# Altium PCB 100_AC-DC.PcbDoc
Units mil, origin at the board's own origin, x right, y up, seen from the top; angles counter-clockwise.
Board outline 6141.73 x 10078.74 mil, 2 copper layers (Top Layer, Bottom Layer), stack 58.66 mil thick; 69 components, 31 nets, 183 pads, 0 vias.
Unrouted connection lines stored in the file: 137.
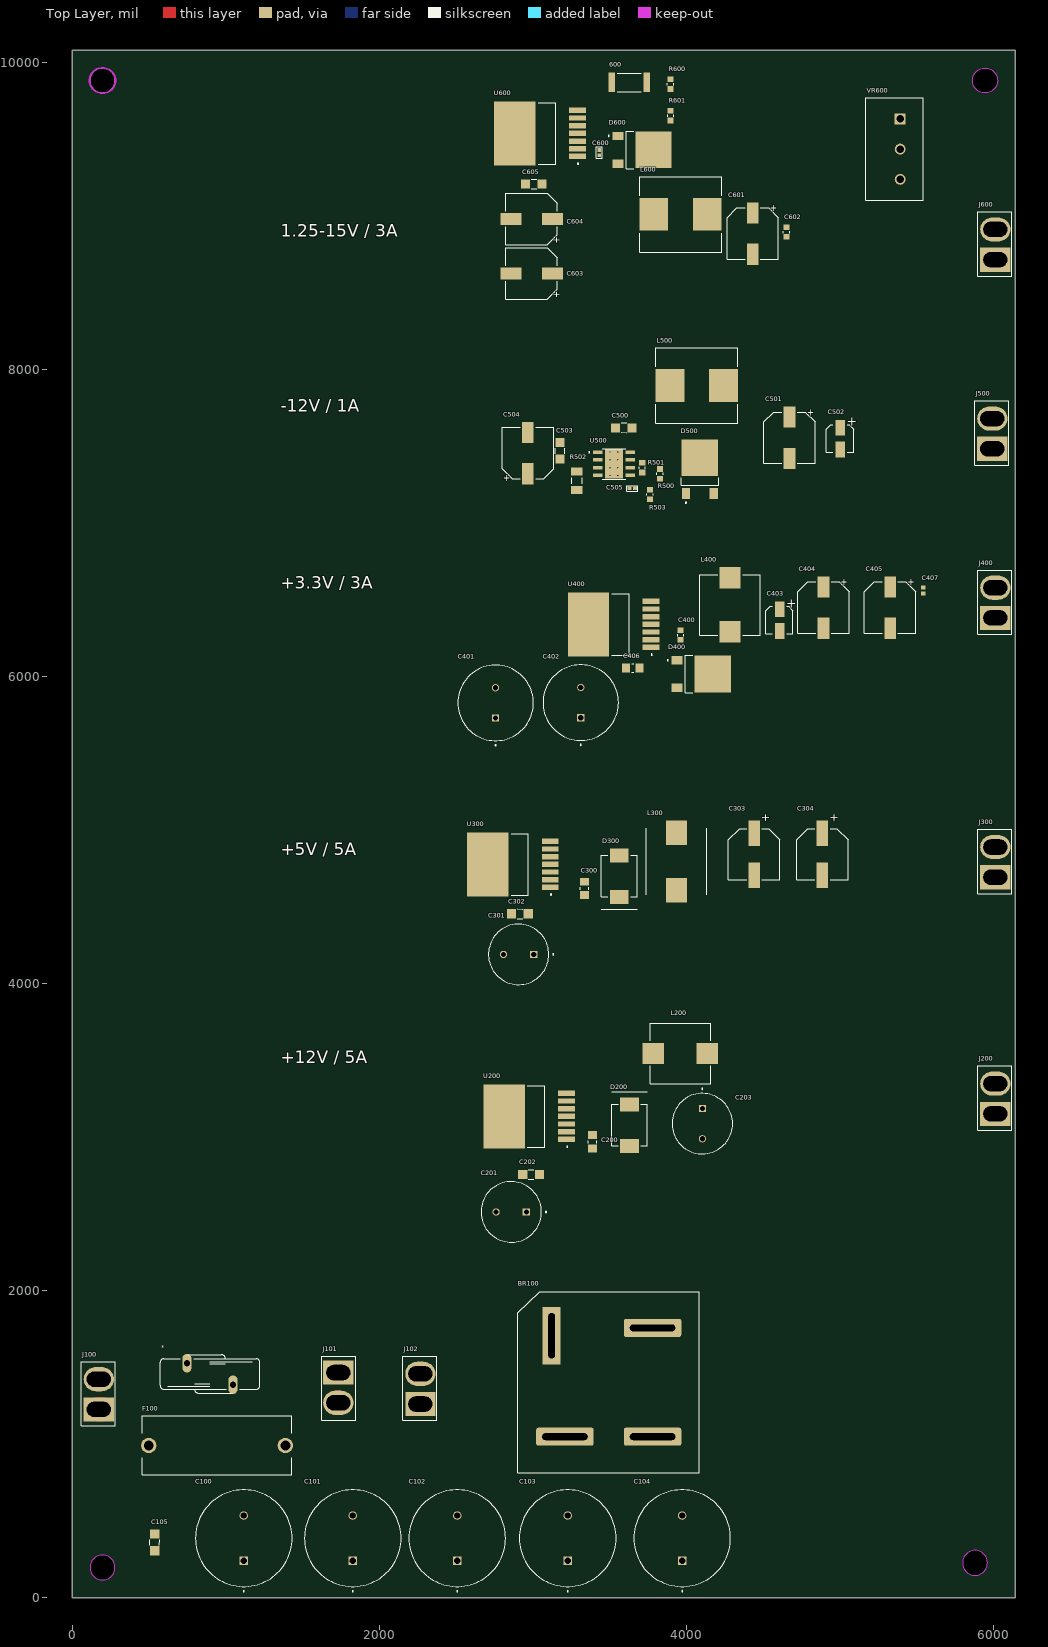
[diagram p0: Top Layer view]
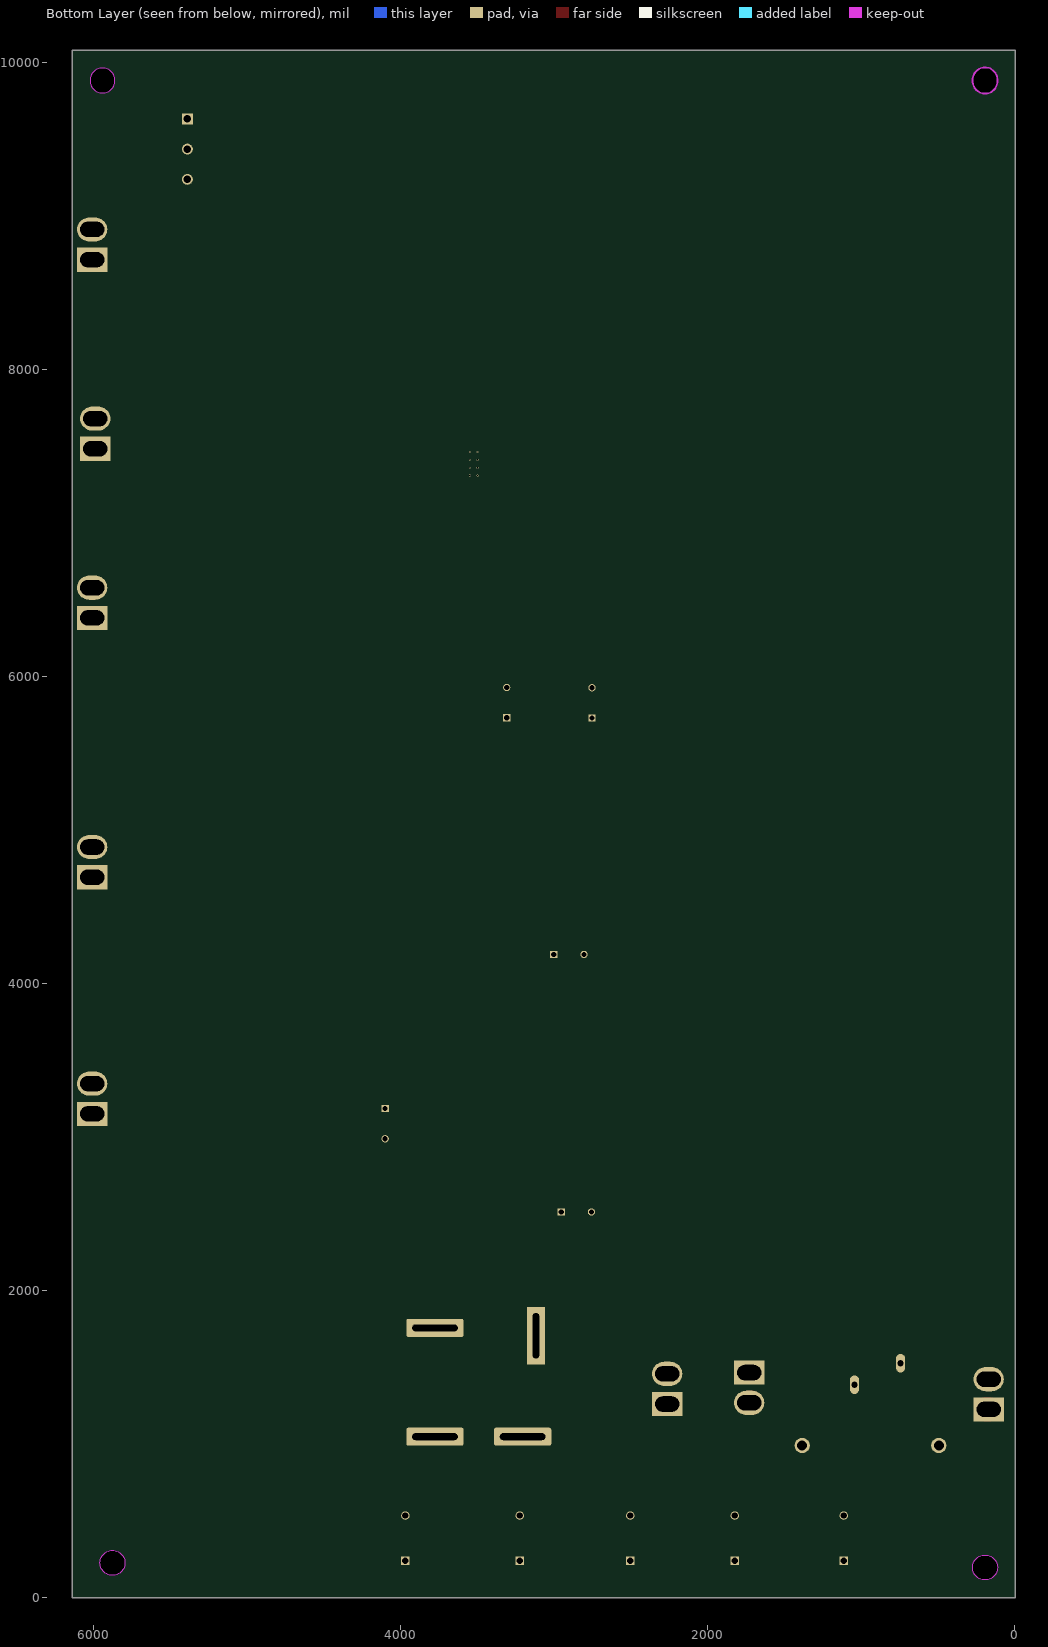
[diagram p1: Bottom Layer view, seen from below]

## Layer stack, top to bottom
Top Solder: solder mask 0.4, Solder Resist, Dk 3.5
Top Layer: signal copper 1.18
Dielectric 1: dielectric 56.3, FR-4, Dk 4.8
Bottom Layer: signal copper 1.18
Bottom Solder: solder mask 0.4, Solder Resist, Dk 3.5

## Board outline
-2.13,0 -2.13,10078.74 6139.6,10078.74 6139.6,0
cut-out: 5796.38,226.85 ccw(c5877.75,226.85) 5877.75,145.47 ccw(c5877.75,226.85) 5959.13,226.85 ccw(c5877.75,226.85) 5877.75,308.23 ccw(c5877.75,226.85)
cut-out: 113.35,196.85 ccw(c194.72,196.85) 194.72,115.47 ccw(c194.72,196.85) 276.1,196.85 ccw(c194.72,196.85) 194.72,278.23 ccw(c194.72,196.85)
cut-out: 5942.75,9800.51 cw(c5942.75,9881.89) 5861.38,9881.89 cw(c5942.75,9881.89) 5942.75,9963.27 cw(c5942.75,9881.89) 6024.13,9881.89 cw(c5942.75,9881.89)
cut-out: 194.72,9800.25 cw(c194.72,9881.89) 113.08,9881.89 cw(c194.72,9881.89) 194.72,9963.53 cw(c194.72,9881.89) 276.21,9886.9 cw(c276.1,9881.89) 281.12,9881.89 cw(c194.72,9881.89) 281.06,9884.86 281.07,9884.69 cw(c276.05,9884.69) 276.34,9879.68 cw(c194.72,9881.89)
cut-out: 194.72,9800.78 cw(c194.72,9881.89) 113.61,9881.89 cw(c194.72,9881.89) 194.72,9963 cw(c194.72,9881.89) 275.68,9886.89 cw(c194.72,9881.89) 275.84,9881.89 275.81,9879.68 cw(c194.72,9881.89)
cut-out: 113.35,9881.89 cw(c194.72,9881.89) 194.72,9963.27 cw(c194.72,9881.89) 276.1,9881.89 cw(c194.72,9881.89) 194.72,9800.51 cw(c194.72,9881.89)

## Design rules (kind name [scope] priority, off if disabled: settings)
Clearance [All] p1: gap=6 ignorepadtopadclearanceinfootprint=FALSE
Clearance Clearance_Kepaut [OnLayer('Keep-Out Layer')] p2: gap=8 ignorepadtopadclearanceinfootprint=FALSE
HoleSize [All] p1: absolutevalues=TRUE maxlimit=6.3 minlimit=6.3 maxpercent=80.000 minpercent=20.000
HoleToHoleClearance [All] p1: gap=4 allowstackedmicrovias=TRUE
MinimumSolderMaskSliver [All] p1: minsoldermaskwidth=6
PolygonConnect [All] p1: connectstyle=Relief reliefconductorwidth=10 reliefentries=4 polygonreliefangle="90 Angle" airgapwidth=10
RoutingVias [All] p1: holewidth=28 width=50 viastyle="Through Hole" minholewidth=28 minwidth=50 maxholewidth=28 maxwidth=50
SilkToSilkClearance [All] p1: silktosilkclearance=6
SilkToSolderMaskClearance [IsPad] p1: minsilkscreentomaskgap=4 clearancetoexposedcopper=TRUE
SolderMaskExpansion [All] p1: expansion=4 istentingtop=FALSE
SupplyNets "Schematic Supply Nets_6" [InNet('+1.25-15V')] p1: voltage=0.000
SupplyNets "Schematic Supply Nets_5" [InNet('+24V')] p2: voltage=0.000
SupplyNets "Schematic Supply Nets_4" [InNet('+12V')] p3: voltage=0.000
SupplyNets "Schematic Supply Nets_3" [InNet('+5V')] p4: voltage=0.000
SupplyNets "Schematic Supply Nets_2" [InNet('GND')] p5: voltage=0.000
SupplyNets "Schematic Supply Nets_1" [InNet('-12V')] p6: voltage=0.000
SupplyNets "Schematic Supply Nets" [InNet('+3.3V')] p7: voltage=0.000
Width [All] p1: maxlimit=500 minlimit=6 preferedwidth=10
25 further rules are at their usual default settings.

## Classes and differential pairs
component class 204_DC-DC: 600 C600 C601 C602 C603 C604 C605 D600 J600 L600 R600 R601 U600 VR600
component class 203_DC-DC: C500 C501 C502 C503 C504 C505 D500 J500 L500 R500 R501 R502 R503 U500
component class 202_DC-DC: C400 C401 C402 C403 C404 C405 C406 C407 D400 J400 L400 U400
component class 201_DC-DC: C300 C301 C302 C303 C304 D300 J300 L300 U300
component class 200_DC-DC: C200 C201 C202 C203 D200 J200 L200 U200
component class 100_AC-DC: * BR100 C100 C101 C102 C103 C104 C105 F100 J100 J101 J102

## Components (designator, comment, footprint, x,y, rotation, side; value= is the part's Value field where it differs from the comment)
600 "33R 2W" 2512 3625,9870 r0 top value=33R
* "RV_Varistor_300VAC_125J_D14" RV_Varistor_300VAC_125J_D14 900.74,1446.34 r270 top
BR100 "1000V 25A" D_Bridge_1000V_25A_KBPC_FP 3490,1415 r0 top
C100 "C_Alum_2200uF_50V_D18" C_Alum_2200uF_50V_D18 1105,392.64 r90 top value=2200uF
C101 "C_Alum_2200uF_50V_D18" C_Alum_2200uF_50V_D18 1815,392.64 r90 top value=2200uF
C102 "C_Alum_2200uF_50V_D18" C_Alum_2200uF_50V_D18 2495,392.64 r90 top value=2200uF
C103 "C_Alum_2200uF_50V_D18" C_Alum_2200uF_50V_D18 3215,392.64 r90 top value=2200uF
C104 "C_Alum_2200uF_50V_D18" C_Alum_2200uF_50V_D18 3960,392.64 r90 top value=2200uF
C105 "100nF 100V" 1206#1 535,360 r90 top value=100nF
C200 "10000pF 50V" 0805 3386.81,2969.32 r270 top value=10nF
C201 "470uF 20%" Cap_470uF_35V_ALUM_RAD 2861.81,2507.63 r180 top value=470uF
C202 "100nF 100V" 1206#1 2985.95,2757.63 r180 top value=100nF
C203 "470uF 20%" Cap_470uF_35V_ALUM_RAD 4106.81,3092.63 r270 top value=470uF
C300 "10000pF 50V" 0805 3335,4620 r270 top value=10nF
C301 "470uF 20%" Cap_470uF_35V_ALUM_RAD 2910,4185 r180 top value=470uF
C302 "100nF 100V" 1206#1 2913.43,4455 r180 top value=100nF
C303 "180uF" Cap_180uF_16V_ALU_SMD 4439.02,4847.54 r90 top
C304 "180uF" Cap_180uF_16V_ALU_SMD 4884.02,4847.54 r90 top
C400 "10nF 100V" 0603 3960,6270 r270 top value=10nF
C401 "680uF 50V" Cap_680uF_50V_ALUM_RAD 2725,5833.43 r90 top value=680uF
C402 "680uF 50V" Cap_680uF_50V_ALUM_RAD 3280,5835 r90 top value=680uF
C403 "10uF 10V" RADIAL-CAN-SMD_Diax4mm_Hx5.5mm 4605,6367.41 r270 top value=10uF
C404 "220uF 50V" RADIAL-CAN-SMD_Diax8mm_Hx10.2mm 4890,6449.1 r270 top value=220uF
C405 "220uF 50V" RADIAL-CAN-SMD_Diax8mm_Hx10.2mm 5325,6449.1 r270 top value=220uF
C406 "0.47uF 50V" 0805 3648.31,6055 r180 top value=0.47uF
C407 "100nF 25V" 0402_RF 5540,6560 r270 top value=0.1uF
C500 "100nF 100V" 1206#1 3590,7620 r0 top value=100nF
C501 "220uF 35V" RADIAL-CAN-SMD_Diax8mm_Hx10.2mm 4670,7555 r270 top value=220uF
C502 "10uF 25V" RADIAL-CAN-SMD_Diax4mm_Hx5.5mm 5000,7550 r270 top value=10uF
C503 "10uF 50V" 1206#1 3175,7470 r90 top value=10uF
C504 "100uF 25V" RADIAL-CAN-SMD_Diax8mm_Hx10.2mm 2965,7455 r90 top value=100uF
C505 "22nF 25V" 0402_1.0mm 3645,7225 r180 top value=22nF
C600 "10nF 50V" 0402 3430,9412.28 r270 top value=10nF
C601 "100uF 25V" RADIAL-CAN-SMD_Diax8mm_Hx10.2mm 4430,8885 r270 top value=100uF
C602 "100nF 25V" 0603 4650,8895 r270 top value=0.1uF
C603 "220uF 50V" RADIAL-CAN-SMD_Diax8mm_Hx10.2mm 2990,8625 r180 top value=220uF
C604 "220uF 50V" RADIAL-CAN-SMD_Diax8mm_Hx10.2mm 2990,8980 r180 top value=220uF
C605 "100nF 100V" 1206#1 3004.49,9207.39 r180 top value=100nF
D200 "100V 8A" DO_214AB 3626.81,3077.63 r270 top
D300 "100V 8A" DO_214AB 3560,4700 r90 top
D400 "60V 10A" D_Schottky_30V_200mA_SOT23-3_1 4070,6010 r0 top
D500 "60V 10A" D_Schottky_30V_200mA_SOT23-3_1 4090.59,7325.49 r90 top
D600 "60V 10A" D_Schottky_30V_200mA_SOT23-3_1 3685,9425 r0 top
F100 "500V 10A" FUSE_HLD_CARTRIDGE_5x20mm 940.74,991.34 r0 top
J100 "2X1" CON_2X1_TH_5MM_BAT 170.74,1324.76 r90 top
J101 "2X1" CON_2X1_TH_5MM_BAT 1730.74,1368.15 r270 top
J102 "2X1" CON_2X1_TH_5MM_BAT 2265,1360 r90 top
J200 "2X1" CON_2X1_TH_5MM_BAT 6010,3250 r90 top
J300 "2X1" CON_2X1_TH_5MM_BAT 6010,4790.95 r90 top
J400 "2X1" CON_2X1_TH_5MM_BAT 6010,6480 r90 top
J500 "2X1" CON_2X1_TH_5MM_BAT 5990,7581.57 r90 top
J600 "2X1" CON_2X1_TH_5MM_BAT 6010,8813.43 r90 top
L200 "15uH" L_15uH_7A_SMD 3961.81,3537.63 r0 top
L300 "22uH 5A" L_22uH_5A_SMD_FIXED 3945,4800 r90 top value=22uH
L400 "15uH" L_15uH_7A_SMD 4290,6470 r90 top
L500 "47uH 3A" L_2SMD_11.5x10X4MM 4065,7895 r180 top value=47uH
L600 "47uH 3A" L_2SMD_11.5x10X4MM 3960,9010 r180 top value=47uH
R500 "10k 1/10W" 0603 3825,7320 r90 top value=10k
R501 "140K 1/10W" 0603 3710,7360 r90 top value=140k
R502 "200k 1/4W" 1206#2 3285,7275 r270 top value=200k
R503 "10k 1/10W" 0603 3760,7185 r90 top value=10k
R600 "1/10W" 0603 3895,9858.37 r270 top value=26K1
R601 "1k 1/10W" 0603 3895,9653.37 r90 top value="1k 0.1%"
U200 "DCDC_12V_5A_TO263" DCDC_12V_5A_TO263 2961.81,3137.63 r90 top
U300 "DCDC_5V_5A_TO263" DCDC_5V_5A_TO263 2792.32,4760 r90 top
U400 "DCDC_3.3V_5A_TO263" DCDC_3.3V_5A_TO263 3602.36,6337.95 r90 top
U500 "DCDC_ADJ_5A_DDA" DCDC_ADJ_5A_DDA 3520.28,7394.8 r0 top
U600 "DCDC_ADJ_5A_TO263" DCDC_ADJ_5A_TO263 3078.39,9536.33 r90 top
VR600 "10k 1/5W" Pot_3x1_5mm_TH 5390,9435 r0 top value=10K

## Footprints (in the part's own frame and the unit in brackets; to place one, negate y for a bottom-side part, rotate by r counter-clockwise, add the part's x,y. Pads: shape width x height; smd on the part's side, far side on the other; paste and mask are expansions set on the pad)
0402 [mm] "1005 Metric / 20190225 / C-A.Serna.A"
  rect 0.62x0.584 smd: 1(-0.45,0) 2(0.45,0)
  silkscreen extent -0.94,-0.48 0.94,0.47, body extent -0.5,-0.25 0.5,0.25, height 0.55
0402_1.0mm [mm] "1005 Metric/20230206/J-A.Sepulveda"
  rect 0.6x0.6 smd: 1(-0.45,0) 2(0.45,0)
  silkscreen extent -0.92,-0.47 0.92,0.47, body extent -0.5,-0.25 0.5,0.25, height 1.1
0402_RF [mil] "1005 Metric/20230306/ J-A.Sepulveda"
  rect 27x27 smd: 1(-19.5,0) 2(19.5,0)
  body extent -20,-10 19,10, height 22
0603 [mil] "1608 Metric / 20190225 / C-A.Serna.A"
  rect 37x40 smd: 1(-31.5,0) 2(31.5,0)
  silkscreen extent -7,-20 8,20, body extent -31,-16 32,16, height 12
0805 [mm] "2012 Metric / 20190225 / C-A.Serna.A"
  rect 1.3x1.5 smd: 1(-1.1,0) 2(1.1,0)
  silkscreen extent -0.2,-0.7 0.2,0.7, body extent -1.1,-0.7 1.1,0.7, height 1
1206#1 [mm] "/20220628/F-A.Ospina"
  rect 1.5x1.5 smd: 1(-1.375,0) 2(1.375,0)
  silkscreen extent -0.45,-0.79 0.45,0.79, body extent -1.62,-0.78 1.58,0.82, height 2.01
1206#2 [mm] "3216 metric/ 20190327/ V-A.Patino"
  rect 1.35x1.9 smd: 1(-1.55,0) 2(1.55,0)
  silkscreen extent -0.5,-0.85 0.5,0.85, body extent -1.67,-0.87 1.67,0.87, height 0.75
2512 [mm] "6432 metric/ 20190613/ J-P.Vargas.A"
  rect 1.05x3.25 smd: 1(-2.9,0) 2(2.9,0)
  silkscreen extent -2,-1.52 2,1.53, body extent -3.25,-1.7 3.25,1.7, height 0.75
C_Alum_2200uF_50V_D18 [mm]
  round 1.4 hole 1.05: N(3.623,-0.254)
  rect 1.4x1.4 hole 1.05: P(-3.877,-0.254)
  silkscreen extent -8.98,-8.25 7.87,7.75, body extent -8.13,-8.25 7.87,7.74, height 31.5
Cap_180uF_16V_ALU_SMD [mm] "20/11/2026"
  rect 4.2x1.9 smd paste+0 mask+0.102: 1(3.373,0) 2(-3.627,0)
  silkscreen extent -4.38,-4.25 4.12,4.25, body extent -4.5,-4.29 4.7,4.21, height 7.6
Cap_470uF_35V_ALUM_RAD [mm]
  round 1.2 hole 0.85: N(2.627,-0.127)
  rect 1.2x1.2 hole 0.85: P(-2.373,-0.127)
  silkscreen extent -5.72,-5.13 5.12,4.87, body extent -4.86,-5.12 5.13,4.86, height 16
Cap_680uF_50V_ALUM_RAD [mm]
  round 1.2 hole 0.85: N(2.373,-0.762)
  rect 1.2x1.2 hole 0.85: P(-2.627,-0.762)
  silkscreen extent -7.23,-7.01 6.12,5.49, body extent -6.38,-7.01 6.12,5.49, height 30
CON_2X1_TH_5MM_BAT [mm] "/20220107/J-E.Pachon"
  rect 4x5 hole 4 slot 2.5 at 0 deg: 1(-2.5,0)
  oval 4x5 hole 4 slot 2.5 at 0 deg: 2(2.5,0)
  silkscreen extent -5.22,-2.74 5.42,2.92, body extent -5.11,-2.55 5.29,2.75, height 12.6
D_Bridge_1000V_25A_KBPC_FP [mm]
  rect 3x9.5 hole 7.5 slot 1.1 at 0 deg: 1(-9.4,7.4)
  rrect25% 9.5x3 hole 1.1 slot 7.5 at 0 deg: 2(-7.2,-9.3) 3(7.3,-9.3)
  rrect24% 9.5x3 hole 1.1 slot 7.5 at 0 deg: 4(7.3,8.7)
  silkscreen extent -15,-15.3 15,14.7, body extent -14.28,-14.58 14.32,14.02, height 7.79
D_Schottky_30V_200mA_SOT23-3_1 [mm]
  rect 1.8x1.4 smd paste+0 mask+0.102: 1(-3.393,2.427) 2(-3.393,-2.143)
  rect 5.97x6.1 smd paste-4 mask+0.102: 3(2.527,0.142)
  silkscreen extent -5.01,-2.96 -0.78,3.24, body extent -3.89,-2.96 5.11,3.24, height 1.4
DCDC_3.3V_5A_TO263 [mm]
  rect 0.89x2.79 smd: 1(-3.758,-4.194) 2(-2.488,-4.194) 3(-1.218,-4.194) 4(0.052,-4.194) 5(1.322,-4.194) 6(2.592,-4.194) 7(3.862,-4.194)
  rect 10.58x6.84 smd paste-6: 8(0.052,6.156)
  silkscreen extent -5.05,-4.4 5.13,2.3, body extent -5,-5.62 5.1,9.62, height 4.65
DCDC_5V_5A_TO263 [mm]
  rect 0.89x2.79 smd: 1(-3.388,-8.095) 2(-2.118,-8.095) 3(-0.848,-8.095) 4(0.422,-8.095) 5(1.692,-8.095) 6(2.962,-8.095) 7(4.232,-8.095)
  rect 10.58x6.84 smd paste-6: 8(0.422,2.255)
  silkscreen extent -4.68,-8.3 5.5,-1.61, body extent -4.63,-9.53 5.47,5.71, height 4.65
DCDC_12V_5A_TO263 [mm]
  rect 0.89x2.79 smd: 1(-3.876,-6.503) 2(-2.606,-6.503) 3(-1.336,-6.503) 4(-0.066,-6.503) 5(1.204,-6.503) 6(2.474,-6.503) 7(3.744,-6.503)
  rect 10.58x6.84 smd paste-6: 8(-0.066,3.847)
  silkscreen extent -5.17,-6.71 5.01,-0.01, body extent -5.11,-7.93 4.98,7.31, height 4.65
DCDC_ADJ_5A_DDA [mm]
  rrect5% 1.55x0.6 smd mask+0: 1(-2.565,1.671) 2(-2.565,0.401) 3(-2.565,-0.869) 4(-2.565,-2.139) 5(2.835,-2.139) 6(2.835,-0.869) 7(2.835,0.401) 8(2.835,1.671)
  rect 2.95x4.9 smd paste-3 mask+0: 9(0.135,-0.234)
  round 0.3 hole 0.2: 10(-0.515,1.716) 11(0.785,1.716) 12(-0.515,0.416) 13(0.785,0.416) 14(-0.515,-0.884) 15(0.785,-0.884) 16(-0.515,-2.184) 17(0.785,-2.184)
  silkscreen extent -4.03,-2.76 2.09,2.29, body extent -2.86,-2.68 3.14,2.22, height 1.7
DCDC_ADJ_5A_TO263 [mm]
  rect 0.89x2.79 smd: 1(-3.783,-5.32) 2(-2.513,-5.32) 3(-1.243,-5.32) 4(0.027,-5.32) 5(1.297,-5.32) 6(2.567,-5.32) 7(3.837,-5.32)
  rect 10.58x6.84 smd paste-6: 8(0.027,5.03)
  silkscreen extent -5.07,-5.53 5.11,1.17, body extent -5.02,-6.75 5.08,8.49, height 4.65
DO_214AB [mm] "DO_214AB/20220518/F-A.Ospina"
  rect 2.29x3.12 smd: 1(-3.43,0) 2(3.43,0)
  silkscreen extent -5.5,-2.95 3.43,2.95, body extent -3.97,-2.95 3.97,2.95, height 2.62
FUSE_HLD_CARTRIDGE_5x20mm [mil] "/20201016/C-A.Serna.A"
  round 100 hole 65: 1(-444.88,0) 2(444.88,0)
  silkscreen extent -488,-192 488,194, body extent -488,-192 488,194, height 506
L_2SMD_11.5x10X4MM [mm] "/ 270326 /J.Jaramillo"
  rect 4.75x5.4 smd: 1(4.425,0) 2(-4.425,0)
  silkscreen extent -6.8,-6.25 6.8,6.25, body extent -6.8,-6.25 6.8,6.25, height 4
L_15uH_7A_SMD [mm]
  rect 3.55x3.5 smd paste+0 mask+0.102: 1(-4.565,0.205) 2(4.385,0.205)
  silkscreen extent -5.09,-4.8 4.91,5.2, body extent -5.78,-4.8 5.22,5.2, height 4
L_22uH_5A_SMD_FIXED [mm]
  rect 4.1x3.5 smd: 1(-4.869,0.32) 2(4.631,0.32)
  silkscreen extent -5.62,-4.68 5.38,5.32, body extent -5.69,-4.68 5.45,5.32, height 3.8
Pot_3x1_5mm_TH [mm] "20190528/ V-A.Patino"
  rect 1.8x1.8 hole 1.27: 1(0,5)
  round 1.8 hole 1.27: 2(0,0) 3(0,-5)
  silkscreen extent -5.7,-8.5 3.8,8.5, body extent -5.64,-8.55 18.86,8.45, height 21
RADIAL-CAN-SMD_Diax4mm_Hx5.5mm [mm] "20191118 / J-P.Vargas.A"
  rect 2.6x1.6 smd: 1(-1.8,0) 2(1.8,0)
  silkscreen extent -2.27,-2.29 2.23,2.21, body extent -2.5,-2.15 2.5,2.15, height 5.21
RADIAL-CAN-SMD_Diax8mm_Hx10.2mm [mm] "/  270326 / J.Jaramillo"
  rect 3.5x1.95 smd: 1(-3.425,0) 2(3.425,0)
  silkscreen extent -4.25,-4.25 4.25,4.25, body extent -4.65,-4.25 4.65,4.25, height 10.8
RV_Varistor_300VAC_125J_D14 [mil]
  oval 120x60 hole 40: 1(-81,-156) 2(59,144)
  silkscreen extent -136,-331 114,319

## Part data
600: library part Res_33R_2512_2W, "RES SMD 33 OHM 1% 2W 2512", Manufacturer="Bourns Inc.", Manufacturer Part Number=CRM2512-FX-33R0ELF, Supplier Part Number 1=CRM2512-FX-33R0ELFCT-ND, ComponentLink1Description=Digi-Key, ComponentLink1URL=https://www.digikey.com/product-detail/en/bourns-inc/CRM2512-FX-33R0ELF/CRM2512-FX-33R0ELFCT-ND/5775020, Last modified by=J.Jaramillo, Last modified date=20240310, Reel Stock=N/A, Supplier 1=Digi-Key
*: "470 V 6 kA Varistor 1 Circuitos Orificio pasante Tipo moneda 14mm", Manufacturer=TDK, Manufacturer Part Number=B72214P2301K101, Last modified by=R.Ducuara, Last modified date=20261120, Reel Sotck=N/A
BR100: library part D_Bridge_1000V_25A_KBPC_FP, "Rectificador de puente Single Phase Estándar 1 kV Montaje de chasis KBPC FP", Manufacturer="Diotec Semiconductor", Manufacturer Part Number=KBPC10/15/2510FP, Supplier Part Number 1=4878-KBPC10/15/2510FP-ND, Last modified by=R.Ducuara, Last modified date=20261120, Reel Stock=N/A, Supplier 1=Digikey
C100 C101 C102 C103 C104: "Capacitores electrolíticos de aluminio 2200 µF 50 V Radial, encapsulado 2000 h a 105°C", Manufacturer="Panasonic Industry", Manufacturer Part Number=EEU-HD1H222, Supplier Part Number 1=P15152-ND, Last modified by=R.Ducuara, Last modified date=20261120, Supplier 1=Digi-Key
C105 C202 C302 C500 C605: library part Cap_0.1uF_1206_100V, "CAP CER 0.1UF 100V X7R 1206", Manufacturer="Samsung Electro-Mechanics", Manufacturer Part Number=CL31B104KCFNNNE, Supplier Part Number 1=1276-1151-1-ND, ComponentLink1Description=Digi-Key, ComponentLink1URL=https://www.digikey.com/en/products/detail/samsung-electro-mechanics/CL31B104KCFNNNE/3886809, Last modified by=J.Jaramillo, Last modified date=20240309, Supplier 1=Digi-Key
C200 C300: library part Cap_10000pF_0805_50V, "CAP CER 10000PF 50V X7R 0805", Manufacturer=Yageo, Manufacturer Part Number=CC0805JRX7R9BB103, Supplier Part Number 1=311-1857-1-ND, ComponentLink1Description=Digi-Key, ComponentLink1URL=https://www.digikey.com/product-detail/en/yageo/CC0805JRX7R9BB103/311-1857-1-ND/5195759, Last modified by=J.Jaramillo, Last modified date=20240309, Reel Stock=N/A, Supplier 1=Digi-Key
C201 C203 C301: library part Cap_470uF_35V_ALUM_RAD, "CAP ALUM 470UF 20% 35V RADIAL TH", Manufacturer="Panasonic Industry", Manufacturer Part Number=ECA-1VM471B, Supplier Part Number 1=10-ECA-1VM471BCT-ND, Last modified by=R.Ducuara, Last modified date=20261121, Supplier 1=Digi-Key
C303 C304: library part Cap_180uF_16V_ALU_SMD, "CAP ALUM POLY 180UF 20% 16V SMD", Manufacturer="Würth Elektronik", Manufacturer Part Number=875075355001, Last modified by=R.Ducuara, Last modified date=20240309, Reel Stock=Digikey, Supplier 1=Newark, Supplier Part Number 1=875075355001
C400: library part Cap_10000pF_0603_100V, "CAP CER 10000PF 100V X7R 0603", Manufacturer="Walsin Technology Corporation", Manufacturer Part Number=0603B103K101CT, Supplier Part Number 1=1292-1383-1-ND, ComponentLink1Description=Digi-Key, ComponentLink1URL=https://www.digikey.com/en/products/detail/walsin-technology-corporation/0603B103K101CT/9354880?s=N4IgTCBcDaIIxgJxgLRwMwA51pQOQBEQBdAXyA, Last modified by=J.Jaramillo, Last modified date=20240309, Supplier 1=Digi-Key
C401 C402: library part Cap_680uF_50V_ALUM_RAD, "Capacitores electrolíticos de aluminio 680 µF 50 V Radial, encapsulado 7000 h a 105°C", Manufacturer="Panasonic Industry", Manufacturer Part Number=EEU-FM1H681L, Last modified by=R,Ducuara, Last modified date=20261120, Supplier 1=Avnet, Supplier Part Number 1=EEU-FM1H681L
C403: library part Cap_10uF_10V_ALU_SMD, "CAP ALUM 10UF 20% 10V SMD", Manufacturer="Würth Elektronik", Manufacturer Part Number=865090240001, Supplier Part Number 1=732-8394-1-ND, ComponentLink1Description="New link", ComponentLink1URL=https://www.digikey.com/en/products/detail/w%C3%BCrth-elektronik/865090240001/5727989?s=N4IgTCBcDaIOwGYwFoAcCCcAWZBGZAcgCIAEIAugL5A, Last modified by=J.Jaramillo, Last modified date=20240309, Supplier 1=Digi-Key
C404 C405 C603 C604: library part Cap_220uF_50V_ALU_SMD, "CAP ALUM 220UF 20% 50V SMD", Manufacturer=Panasonic, Manufacturer Part Number=EEE-FT1H221AP, Supplier Part Number 1=667-EEE-FT1H221AP, ComponentLink1Description=Mouser, ComponentLink1URL=https://www.mouser.com/ProductDetail/Panasonic/EEE-FT1H221AP?qs=CMJjuEs1%252BuFFGBuxQbDfDA==, Last modified by=J.Jaramillo, Last modified date=20240309, Reel Stock=N/A, Supplier 1=Mouser
C406: library part Cap_0.47uF_0805_50V, "CAP CER 0.47UF 50V X7R 0805", Manufacturer=KEMET, Manufacturer Part Number=C0805C474K5RACTU, Supplier Part Number 1=399-8100-1-ND, ComponentLink1Description=Digi-Key, ComponentLink1URL=https://www.digikey.com/products/en?keywords=399-8100-1-ND, Last modified by=J.Jaramillo, Last modified date=20240309, Supplier 1=Digi-Key
C407: library part Cap_0.1uF_0402_25V, "CAP CER 0.1UF 25V X7R 0402", Manufacturer=Yageo, Manufacturer Part Number=CC0402KRX7R8BB104, Supplier Part Number 1=311-2077-1-ND, ComponentLink1Description=Digi-key, ComponentLink1URL=https://www.digikey.com/products/en?keywords=311-2077-1-ND, Last modified by=J.Jaramillo, Last modified date=20240309, Supplier 1=Digi-Key
C501: library part Cap_220uF_35V_ALU_SMD_1, "CAP ALUM 220UF 20% 35V SMD", Manufacturer="Panasonic Electronic Components", Manufacturer Part Number=EEE-1VA221UP, Supplier Part Number 1=PCE3955CT-ND, ComponentLink1Description=Digi-Key, ComponentLink1URL=https://www.digikey.com/products/en?keywords=PCE3955CT-ND, Last modified by=J.Jaramillo, Last modified date=20240309, Reel Stock=N/A, Supplier 1=Digi-Key
C502: library part Cap_10uF_25V_ALU_SMD, "CAP ALUM 10UF 20% 25V SMD", Manufacturer="Würth Elektronik", Manufacturer Part Number=865080440002, Supplier Part Number 1=732-8430-1-ND, ComponentLink1Description=Digi-Key, ComponentLink1URL=https://www.digikey.com/product-detail/en/w-rth-elektronik/865080440002/732-8430-1-ND/5728387, Last modified by=J.Jaramillo, Last modified date=20240309, Supplier 1=Digi-Key
C503: library part Cap_10uF_1206_50V, "CAP CER 10UF 50V X5R 1206", Manufacturer="Murata Electronics North America", Manufacturer Part Number=GRT31CR61H106ME01L, Supplier Part Number 1=490-12457-1-ND, ComponentLink1Description=Digi-Key, ComponentLink1URL=https://www.digikey.com/product-detail/en/murata-electronics-north-america/GRT31CR61H106ME01L/490-12457-1-ND/5417158, Last modified by=J.Jaramillo, Last modified date=20240309, Supplier 1=Digi-Key
C504 C601: library part Cap_100uF_25V_ALU_SMD, "CAP ALUM 100UF 20% 25V SMD", Manufacturer="Panasonic Electronic Components", Manufacturer Part Number=EEE-1EA101AP, Supplier Part Number 1=PCE4593CT-ND, ComponentLink1Description=Digi-Key, ComponentLink1URL=https://www.digikey.com/product-detail/en/panasonic-electronic-components/EEE-1EA101AP/PCE4593CT-ND/1718016, Last modified by=J.Jaramillo, Last modified date=20240309, Supplier 1=Digi-Key
C505: library part Cap_0.022uF_0402_25V, "CAP CER 0.022UF 25V X7R 0402", Manufacturer="Murata Electronics North America", Manufacturer Part Number=GRM155R71E223KA61D, Supplier Part Number 1=490-3252-1-ND, ComponentLink1Description=Digi-key, ComponentLink1URL=https://www.digikey.com/en/products/detail/murata-electronics/GRM155R71E223KA61D/702517?s=N4IgTCBcDaIOICUCyBGArGhB2FBRMYAzANICCAbCgCIgC6AvkA, Last modified by=J.Jaramillo, Last modified date=20240309, Supplier 1=Digi-Key
C600: library part Cap_10000pF_0402_50V, "CAP CER 10000PF 50V X7R 0402", Manufacturer="Murata Electronics North America", Manufacturer Part Number=GCM155R71H103KA55D, Supplier Part Number 1=490-4762-1-ND, ComponentLink1Description=Digi-Key, ComponentLink1URL=https://www.digikey.com/product-detail/en/murata-electronics-north-america/GCM155R71H103KA55D/490-4762-1-ND/1641681, Last modified by=J.Jaramillo, Last modified date=20240309, Reel Stock=N/A, Supplier 1=Digi-Key
C602: library part Cap_0.1uF_0603_25V, "CAP CER 0.1UF 25V X7R 0603", Manufacturer=TDK, Manufacturer Part Number=CGA3E2X7R1E104K080AA, Supplier Part Number 1=445-5667-1-ND, ComponentLink1Description=Digi-key, ComponentLink1URL=https://www.digikey.com/en/products/detail/tdk-corporation/CGA3E2X7R1E104K080AA/2443145?s=N4IgTCBcDaIMIHECCBmAomAGgdgEoEY18AGAFgGliAOYpJEAXQF8g, Last modified by=J.Jaramillo, Last modified date=20240309, Supplier 1=Digi-Key
D200 D300: library part D_Schottky_100V_8A_DO_214AB, "DIODE SCHOTTKY 100V 8A DO214AB", Manufacturer="Micro Commercial Co", Manufacturer Part Number=SK810L-TP, Supplier Part Number 1=SK810L-TPMSCT-ND, ComponentLink1Description=Digi-key, ComponentLink1URL=https://www.digikey.com/en/products/detail/micro-commercial-co/SK810L-TP/2650905?s=N4IgTCBcDaIMoGkAcBGADAGQLQBUAKIAugL5A, Last modified by=J.Jaramillo, Last modified date=20240310, Reel Stock=N/A, Supplier 1=Digi-key
D400 D500 D600: library part D_Schottky_60V_10A_ThinDPAK, "DIODE SCHOTTKY 60V 10A THINDPAK", Manufacturer="Taiwan Semiconductor Corporation", Manufacturer Part Number=MBRAD1060H, Supplier Part Number 1=1801-MBRAD1060HCT-ND, ComponentLink1Description=Digi-Key, ComponentLink1URL=https://www.digikey.com/en/products/detail/onsemi/SBAT54SLT1G/3062594, Last modified by=R.Ducuara, Last modified date=20261120, Reel Stock=N/A, Supplier 1=Digi-Key
F100: library part F_HLD_CARTRIDGE_5x20mm, "FUSE BLOK CARTRIDGE 500V 10A PCB", Manufacturer="Schurter Inc.", Manufacturer Part Number=0031.8201, Supplier Part Number 1=486-1258-ND, ComponentLink1Description=Digi-Key, ComponentLink1URL=https://www.digikey.com/en/products/detail/schurter-inc/0031-8201/669925?s=N4IgTCBcDaIAxwMwEYB0AOMdkgLoF8g, Last modified by=J.Jaramillo, Last modified date=20240309, Reel Sotck=N/A, Supplier 1=Digi-Key
J100 J101 J102 J200 J300 J400 J500 J600: library part Con_2x1_TH_5mm_Battery, "Power Connectors ROHS", Manufacturer="Changzhou Amass Elec", Manufacturer Part Number=XT30U-M, Supplier Part Number 1=C99101, ComponentLink1Description=Digi-Key, ComponentLink1URL=https://lcsc.com/product-detail/Power-Connectors_Changzhou-Amass-Elec-XT30U-M_C99101.html, Last modified by=J.Jaramillo, Last modified date=20240310, Reel Stock=N/A, Supplier 1=LCSC
L200 L400: library part L_15uH_7A_SMD, "15 µH Blindado Núcleo de tambor, cableado Inductivo 7 A 50mOhm máx. No estándar", Manufacturer="Bourns Inc.", Manufacturer Part Number=SRP1040VA-150M, Supplier Part Number 1=118-SRP1040VA-150MCT-ND, Last modified by=R.Ducuara, Last modified date=21/11/2026, Reel Stock=N/A, Supplier 1=Digi-key
L300: library part L_22uH_5A_SMD_FIXED, "22 µH Blindado Moldeado Inductivo 5 A 74mOhm máx. No estándar", Manufacturer="Abracon LLC", Manufacturer Part Number=AMPLA1004S-220MT, Last modified by=R.Ducuara, Last modified date=20261120, Reel Stock=N/A, Supplier 1=Digi-Key, Supplier Part Number 1=AMPLA1004S-220MT
L500 L600: library part L_47uH_3A_SMD_11.5x10MM, "3A 47uH 4,5A 155mÎ© Â±20% SMD,11,5x10mm Fixed Inductors RoHS", Manufacturer="Shun Xiang Nuo", Manufacturer Part Number=SMMS1040-470M, Supplier Part Number 1=C149599, ComponentLink1Description=Datasheet, ComponentLink1URL=https://www.lcsc.com/datasheet/C149599.pdf, ComponentLink2Description=LCSC, ComponentLink2URL=https://www.lcsc.com/product-detail/C149599.html, Last modified by=J.Jaramillo, Last modified date=270326, Reel Stock=N/A, Supplier 1=LCSC
R500 R503: library part Res_10k_0603_1/10W, "RES SMD 10K OHM 1% 1/10W 0603", Manufacturer="Samsung Electro-Mechanics", Manufacturer Part Number=RC1608F103CS, Supplier Part Number 1=1276-3485-1-ND, ComponentLink1Description=Digi-key, ComponentLink1URL=https://www.digikey.com/products/en?keywords=1276-3485-1-ND, Last modified by=J.Jaramillo, Last modified date=20240310, Reel Stock=N/A, Supplier 1=Digi-Key
R501: library part Res_140K_0603_1/10W_1%, "RES SMD 140K OHM 1% 1/10W 0603", Manufacturer=Yageo, Manufacturer Part Number=RC0603FR-07140KL, Supplier Part Number 1=311-140KHRCT-ND, ComponentLink1Description=Digi-Key, ComponentLink1URL=https://www.digikey.com/en/products/detail/yageo/RC0603FR-07140KL/726947?s=N4IgTCBcDaIEoGEAMA2JBmAYnAtEg7AIwAsSA0gDIgC6AvkA, Last modified by=J.Jaramillo, Last modified date=20240310, Reel Stock=N/A, Supplier 1=Digi-Key
R502: library part Res_200k_1206_1/4W, "RES 200K OHM 1% 1/4W 1206", Manufacturer="Stackpole Electronics Inc", Manufacturer Part Number=RMCF1206FT200K, Supplier Part Number 1=RMCF1206FT200KTR-ND, ComponentLink1Description=Digi-Key, ComponentLink1URL=https://www.digikey.com/product-detail/en/stackpole-electronics-inc/RMCF1206FT200K/RMCF1206FT200KTR-ND/1759778, Last modified by=J.Jaramillo, Last modified date=20240310, Reel Stock=N/A, Supplier 1=Digi-Key
R600: library part Res_26k1_0603_1/10W, "RES SMD 26.1K OHM 1% 1/10W 0603", Manufacturer=Yageo, Manufacturer Part Number=AC0603FR-0726K1L, Supplier Part Number 1=13-AC0603FR-0726K1LCT-ND, ComponentLink1Description=Digi-Key, ComponentLink1URL=https://www.digikey.com/en/products/detail/yageo/AC0603FR-0726K1L/5895956, Last modified by=J.Jaramillo, Last modified date=20240310, Reel Stock=N/A, Supplier 1=Digi-Key
R601: library part Res_1k_0603_1/10W_0.1%, "RES SMD 1K OHM 0.1% 1/10W 0603", Manufacturer="Panasonic Electronic Components", Manufacturer Part Number=ERA-3AEB102V, Supplier Part Number 1=P1.0KDBCT-ND, ComponentLink1Description=Digi-Key, ComponentLink1URL=https://www.digikey.com/en/products/detail/panasonic-electronic-components/ERA-3AEB102V/1465854, Last modified by=J.Jaramillo, Last modified date=20240310, Reel Stock=N/A, Supplier 1=Digi-Key
U200: "IC REG BUCK 12V 5A TO263", Manufacturer="Texas Instruments", Manufacturer Part Number=LM2678S-12, Supplier Part Number 1=LM2678S-12-ND, Last modified by=R.Ducuara, Last modified date=20261120, Reel Stock=N/A, Supplier 1=Digikey
U300: "IC REG BUCK 5V 5A TO263", Manufacturer="Texas Instruments", Manufacturer Part Number=LM2678S-5.0, Supplier Part Number 1=LM2678S-5.0-ND, Last modified by=R.Ducuara, Last modified date=20261120, Reel Stock=N/A, Supplier 1=Digikey
U400: "IC REG BUCK 3.3V 5A TO263", Manufacturer="Texas Instruments", Manufacturer Part Number=LM2678S-3.3, Supplier Part Number 1=LM2678S-3.3-ND, Last modified by=R.Ducuara, Last modified date=20261120, Reel Stock=N/A, Supplier 1=Digikey
U500: "IC REG BCK SPLIT RAIL ADJ 8SOPWR", Manufacturer="Texas Instruments", Manufacturer Part Number=TPS54560BDDA, Supplier Part Number 1=296-TPS54560BDDA-ND, Last modified by=R.Ducuara, Last modified date=20261120, Reel Stock=N/A, Supplier 1=Digikey
U600: "IC REG BUCK ADJ 5A TO263", Manufacturer="Texas Instruments", Manufacturer Part Number=LM2678S-ADJ, Supplier Part Number 1=LM2678S-ADJ-ND, Last modified by=R.Ducuara, Last modified date=20261120, Reel Stock=N/A, Supplier 1=Digikey
VR600: library part Pot_10k_1/5W_TH, "POT 10K OHM 1/5W PLASTIC LINEAR", Manufacturer="TT Electronics/BI", Manufacturer Part Number=P160KN-0QC15B10K, Supplier Part Number 1=987-1301-ND, ComponentLink1Description=Digi-key, ComponentLink1URL=https://www.digikey.com/products/en?keywords=P160KN-0QC15B10K, Last modified by=J.Jaramillo, Last modified date=20240310, Reel Stock=N/A, Supplier 1=Digi-Key

## Nets (pads, with @x,y where several pads share a name; then routed paths per layer and width w, separated by ;. In a path a pad name is that pad's centre, name@x,y a point inside that pad or via, vN(x,y) a via of type N, cw(c..) or ccw(c..) an arc to the next point about the centre after c; other vN are vias at no path point)
+1.25-15V: C601.1 C602.1 J600.2 L600.2
+3.3V: C403.1 C404.1 C405.1 C407.1 J400.2 L400.2 U400.6
+5V: C303.1 C304.1 J300.2 L300.2 U300.6
+12V: C203.P J200.2 L200.2 U200.6 U200.7
+24V: BR100.4 C100.P C101.P C102.P C103.P C104.P C105.1 C201.P C202.1 C301.P C302.1 C401.P C402.P C406.1 C503.1 C504.1 C603.1 C604.1 C605.1 U200.2 U300.2 U300.7 U400.2 U400.7 U500.2 U500.3 U600.2 U600.7
-12V: C501.2 C502.2 C505.2 D500.1 J500.1 R502.1 R503.1 U500.9
GND: BR100.2 C100.N C101.N C102.N C103.N C104.N C105.2 C203.N C303.2 C304.2 C401.N C402.N C403.2 C404.2 C405.2 C406.2 C407.2 C501.1 C502.1 C503.2 C504.2 C601.2 C602.2 C603.2 C604.2 C605.2 D200.2 D300.2 D400.1 D600.1 J200.1 J300.1 J400.1 J500.2 J600.1 L500.2 R501.2 R601.1 U200.4 U300.4 U400.4 U400.8 U500.7 U600.4 U600.8
Net600_1: 600.1 U600.6
Net600_2: 600.2 R600.1 VR600.1
Net*_1: *.1 J100.2 J101.1
Net*_2: *.2 F100.2 J101.2 | length 17.2
  Top Layer w160: J101.2@1713.57,1269.72 J101.2
NetBR100_1: BR100.1 J102.2
NetBR100_3: BR100.3 J102.1
NetC200_1: C200.1 U200.3
NetC200_2: C200.2 D200.1 L200.1 U200.1
NetC201_N: C201.N C202.2 U200.8
NetC300_1: C300.1 U300.3
NetC300_2: C300.2 D300.1 L300.1 U300.1
NetC301_N: C301.N C302.2 U300.8
NetC400_1: C400.1 U400.3
NetC400_2: C400.2 D400.3 L400.1 U400.1
NetC500_1: C500.1 U500.1
NetC500_2: C500.2 D500.3 L500.1 U500.8
NetC505_1: C505.1 R500.1
NetC600_1: C600.1 U600.3
NetC600_2: C600.2 D600.3 L600.1 U600.1
NetF100_1: F100.1 J100.1 | length 17.2
  Top Layer w160: J100.1 J100.1@187.9,1226.34
NetR500_2: R500.2 U500.6
NetR501_1: R501.1 R503.2 U500.5
NetR502_2: R502.2 U500.4
NetR600_2: R600.2 R601.2 VR600.2 VR600.3
pads on no net: D400.2 D500.2 D600.2 U200.5 U300.5 U400.5 U500.10 U500.11 U500.12 U500.13 U500.14 U500.15 U500.16 U500.17 U600.5

## Keep-outs
Top Layer:
  lines w10: 276.05,9884.69 ccw(c194.72,9881.89) 276.1,9881.89

## Silkscreen, mask and mechanical layers (free items; w line width, h text height)
Top Overlay:
  text "1.25-15V / 3A" at 1355,8865 h80
  text "-12V / 1A" at 1355,7725 h80
  text "+3.3V / 3A" at 1355,6570 h80
  text "+5V / 5A" at 1355,4835 h80
  text "+12V / 5A" at 1355,3480 h80
Mechanical 2:
  circle w0.5: c5875,215 r81.38
  circle w0.25: c5095.34,1141.34 r0.12
  circle w0.5: c194.72,196.85 r81.38
  circle w0.5: c194.72,9881.89 r81.38
  circle w0.5: c5942.75,9881.89 r81.38
  circle w0.25: c-2.13,10078.74 r0.12
  lines w20: 2435,2255 4530,2255 4530,3855 2435,3855 2435,2255 ; 2435,7080 5305,7080 5305,8300 2435,8300 2435,7080 ; 2435,8375 4750,8375 4750,9995 2435,9995 2435,8375 ; 2440,3945 5165,3945 5165,5230 2440,5230 2440,3945 ; 2440,5475 5640,5475 5640,6875 2440,6875 2440,5475

## Text inside footprints (layer, text, board x,y; h text height)
C303: Top Overlay "+" at 4537.44,5051.2 h50 r90; Mechanical 13 "+" at 4537.44,5051.2 h50 r90
C304: Top Overlay "+" at 4982.44,5051.2 h50 r90; Mechanical 13 "+" at 4982.44,5051.2 h50 r90
C403: Top Overlay "+" at 4716.42,6501.27 h60 r180
C404: Top Overlay "+" at 5050,6632.17 h39.37 r180
C405: Top Overlay "+" at 5485,6632.17 h39.37 r180
C501: Top Overlay "+" at 4830,7738.07 h39.37 r180
C502: Top Overlay "+" at 5111.42,7683.86 h60 r180
C504: Top Overlay "+" at 2805,7271.93 h39.37
C601: Top Overlay "+" at 4590,9068.07 h39.37 r180
C603: Top Overlay "+" at 3173.07,8465 h39.37 r90
C604: Top Overlay "+" at 3173.07,8820 h39.37 r90